# Altium PCB LMX2592.PcbDoc
Units mil, origin at the board's own origin, x right, y up, seen from the top; angles counter-clockwise.
Board outline 1035 x 1455 mil, 4 copper layers (L1, L2, L3, L4), stack 59.528 mil thick; 43 components, 29 nets, 153 pads, 100 vias.
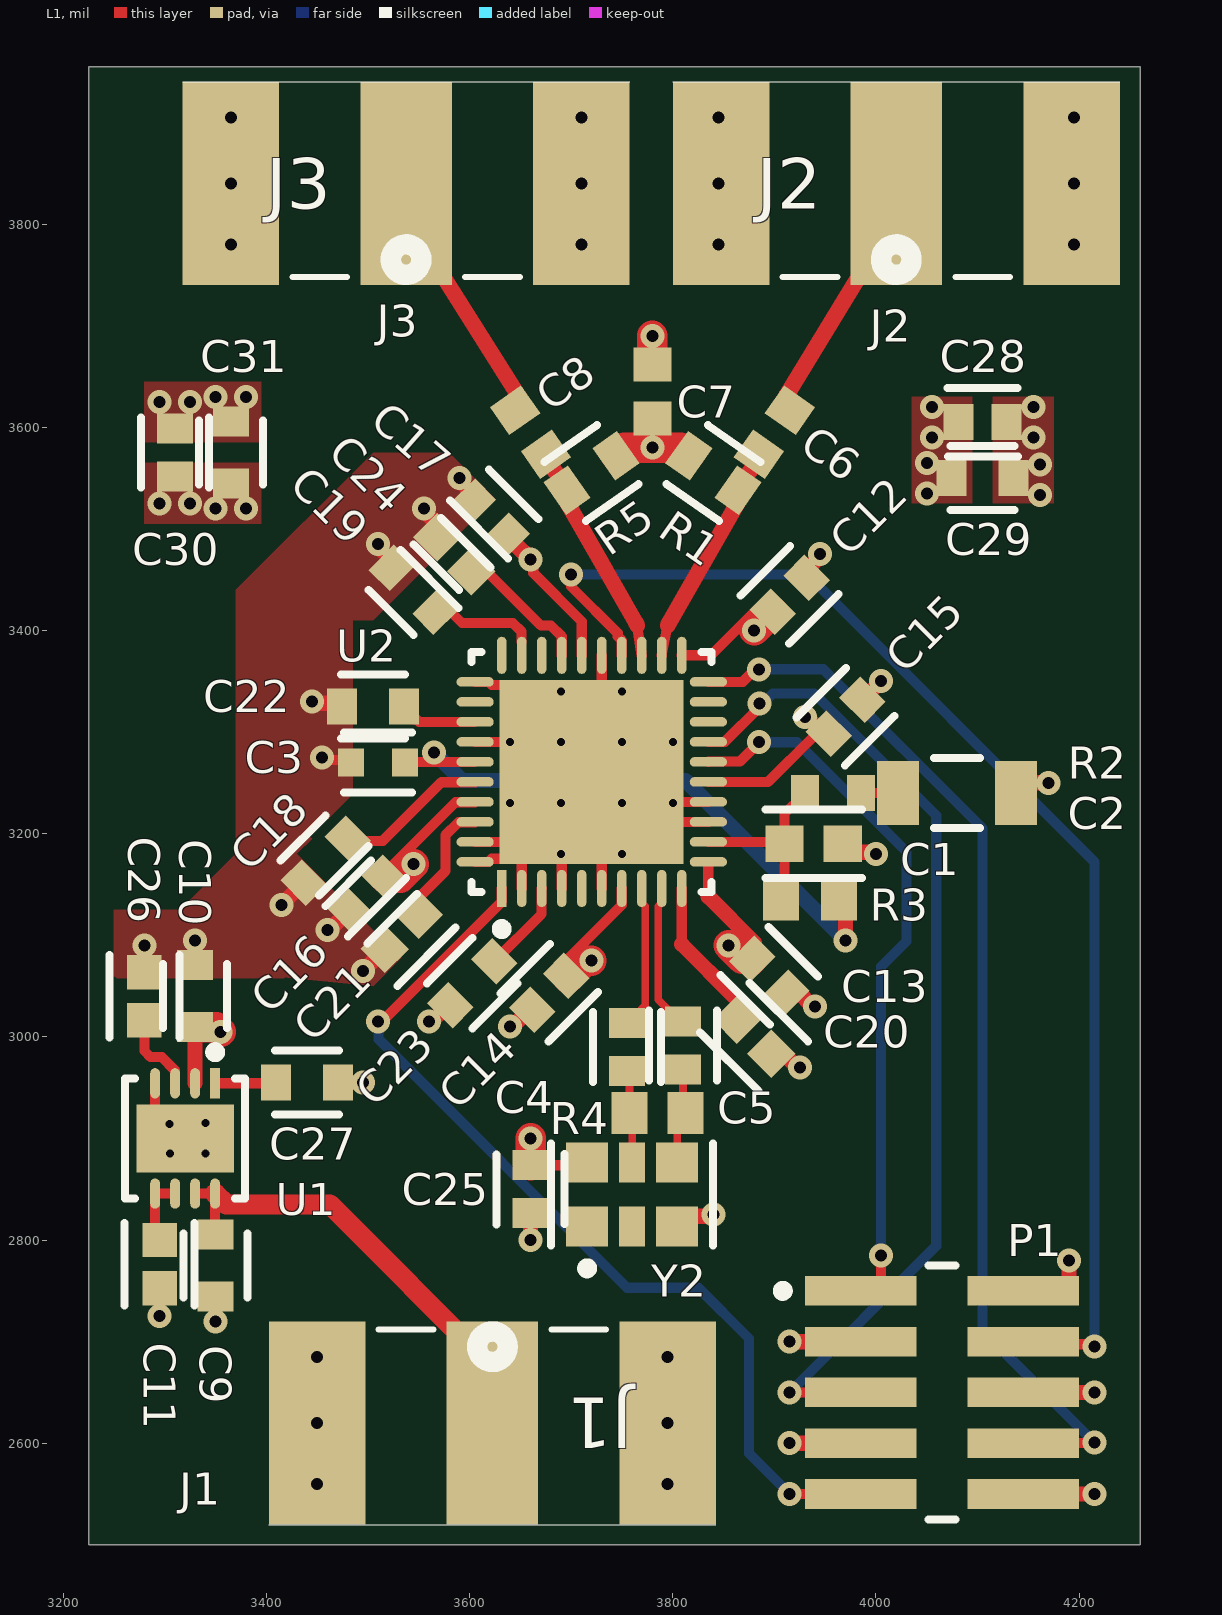
[diagram p0: L1 view]
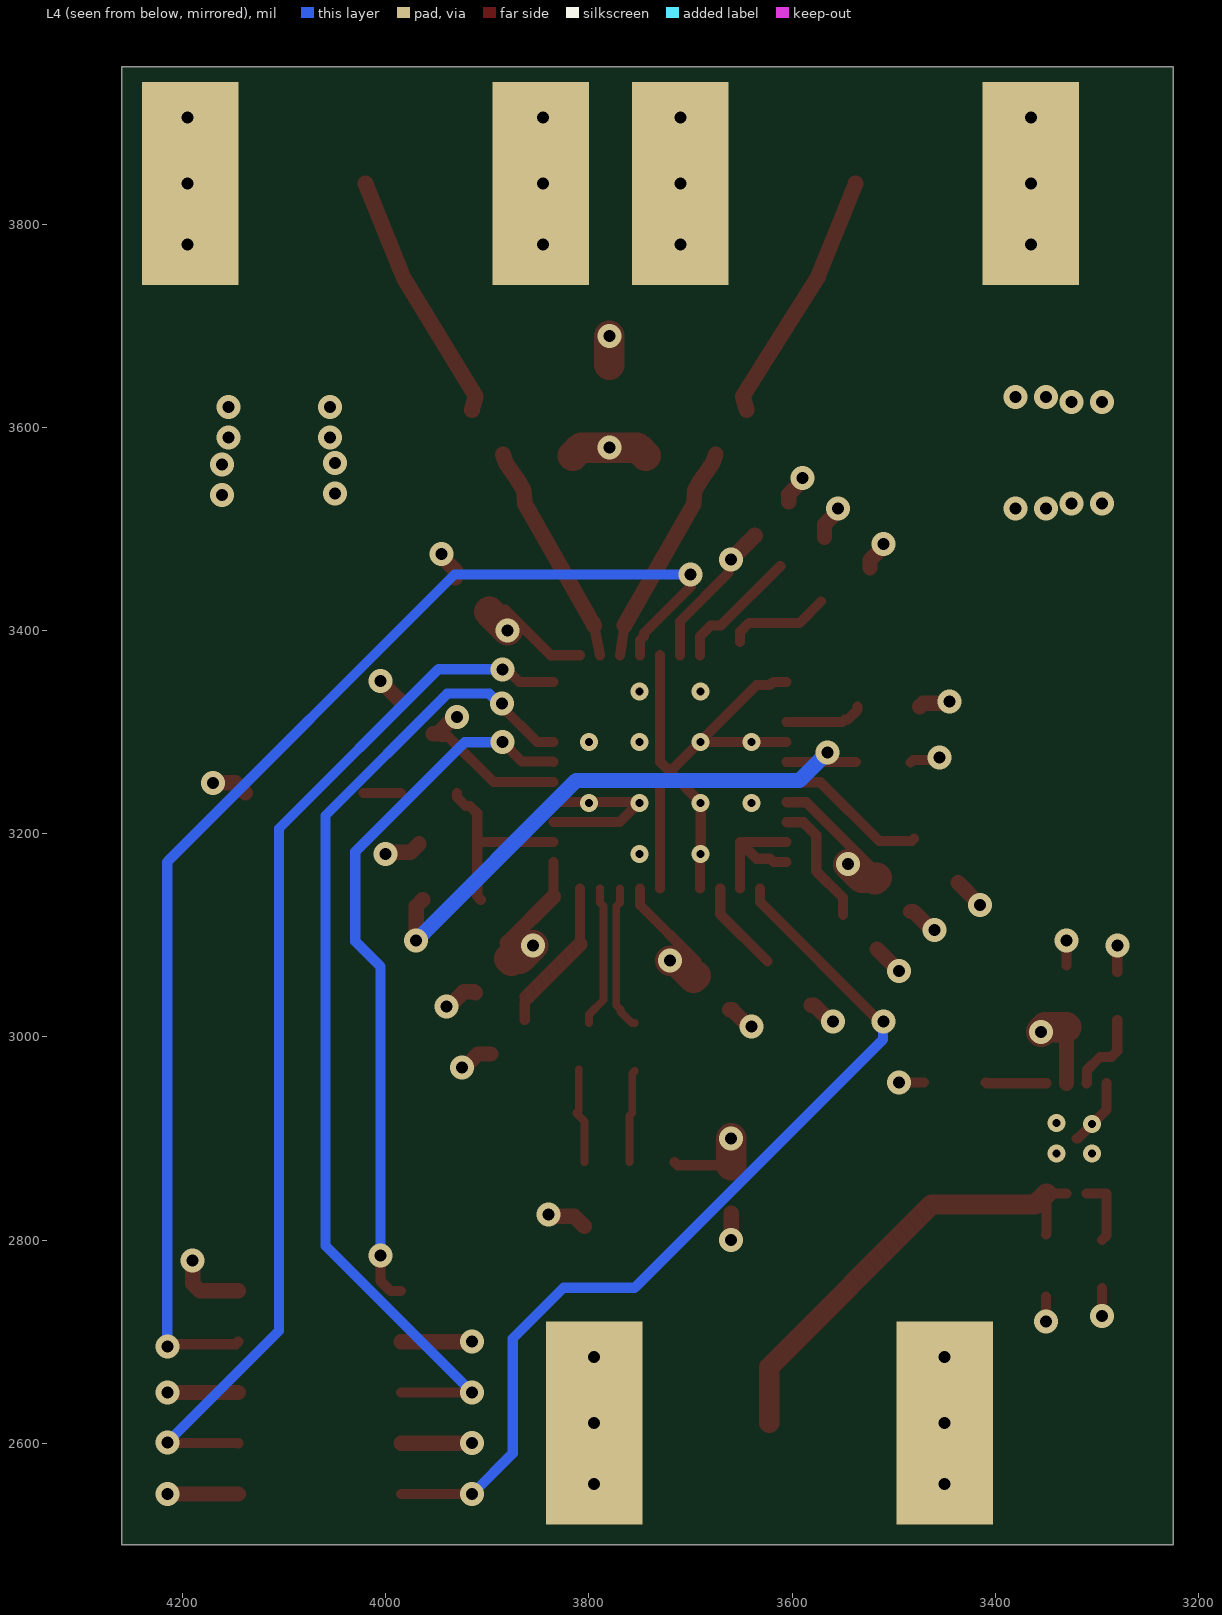
[diagram p1: L4 view, seen from below]
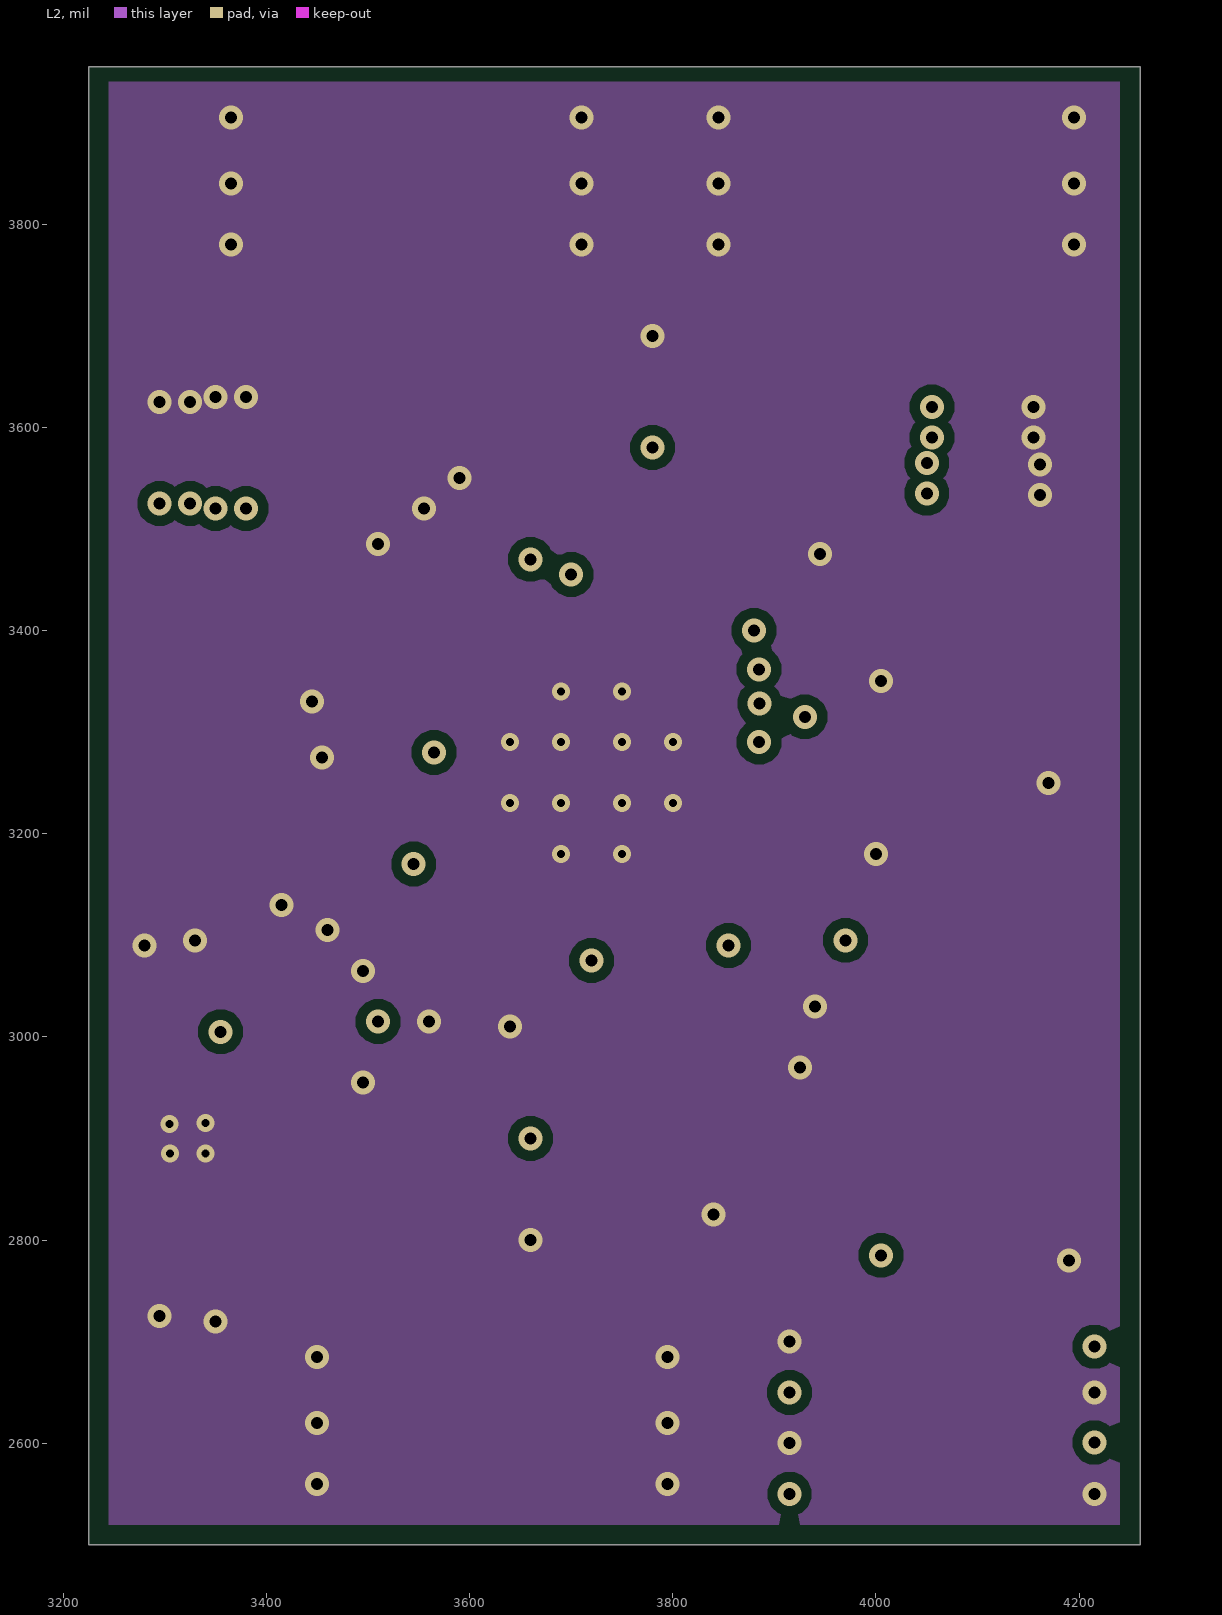
[diagram p2: L2]
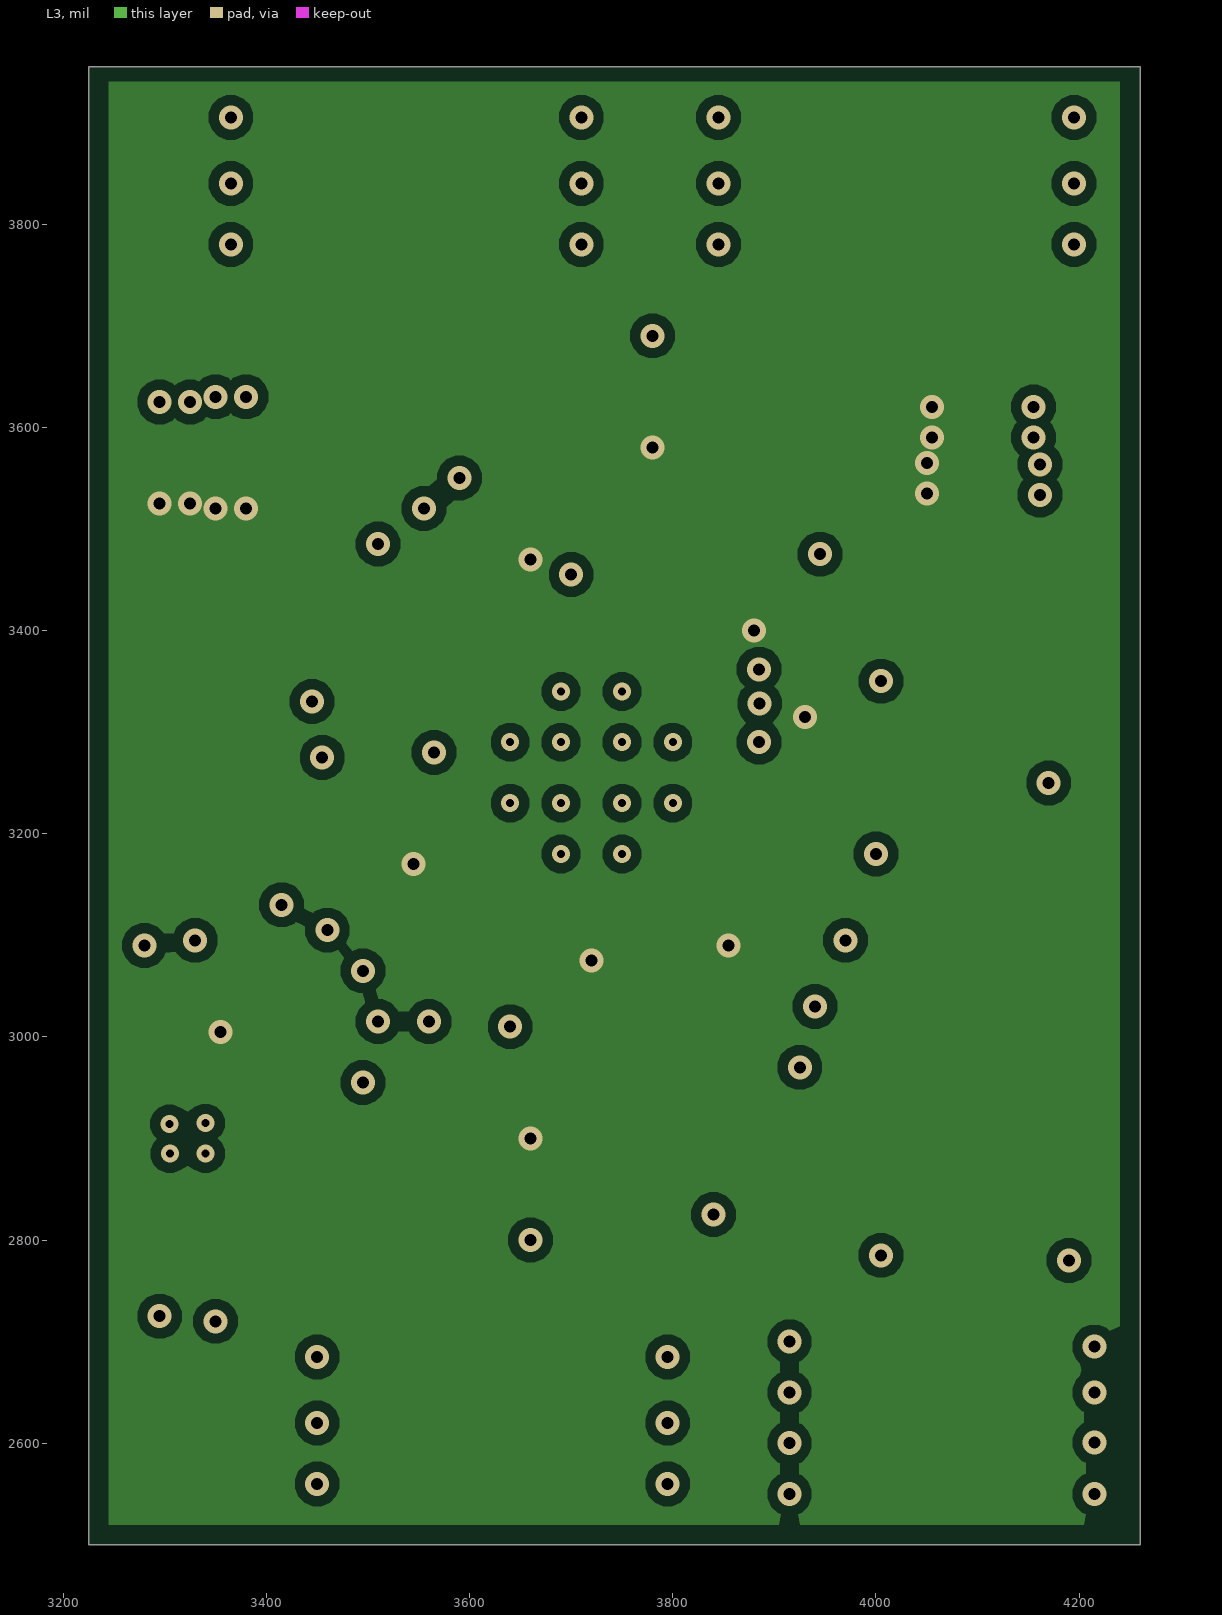
[diagram p3: L3]
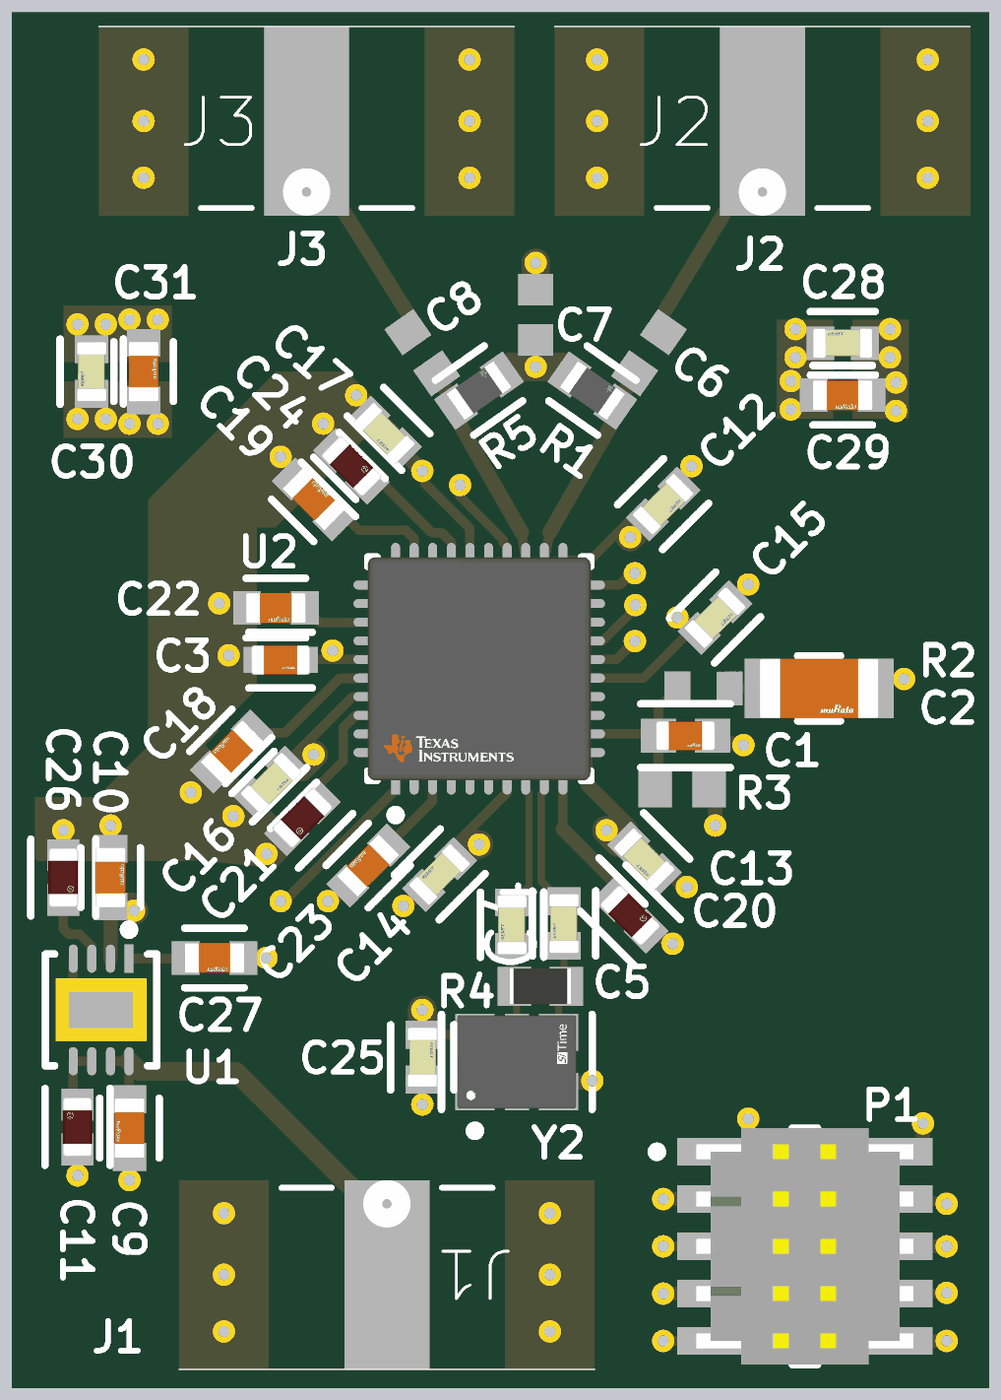
[diagram p4: 3D render of the assembled board from above, using the file's embedded part models]

## Layer stack, top to bottom
Top Solder: solder mask 0.591, Solder Resist, Dk 3.5
L1: signal copper 1.693
Dielectric 1: prepreg 7.874, FR408HR 2113, Dk 3.61
L2: signal copper 0.689
Dielectric 2: core 39.016, FR408HR, Dk 4.8
L3: signal copper 0.689
Dielectric 3: prepreg 7.874, FR408HR 2113, Dk 3.61
L4: signal copper 1.693
Bottom Solder: solder mask 0.591, Solder Resist, Dk 3.5

## Board outline
3225,2500 3225,3955 4260,3955 4260,2500

## Design rules (kind name [scope] priority, off if disabled: settings)
Clearance OSC_PAD [IsPad And InComponent('U1')] p1: gap=10 ignorepadtopadclearanceinfootprint=FALSE except(3: SMDPad-SMDPad; 6: Arc-Arc Arc-Track Arc-SMDPad Arc-Via Track-Track Track-SMDPad Track-Via SMDPad-Via)
Clearance OSC_PAIR [InNet('REF_CLK_P') vs InNet('REF_CLK_N')] p2: gap=10 ignorepadtopadclearanceinfootprint=FALSE except(5: Arc-Arc Arc-Track Track-Track; 6: Arc-SMDPad Arc-Via Track-SMDPad Track-Via SMDPad-SMDPad SMDPad-Via)
Clearance PLL_PAD [IsPad And InComponent('U2')] p3: gap=10 ignorepadtopadclearanceinfootprint=FALSE except(3.94: SMDPad-SMDPad; 6: Arc-Arc Arc-Track Arc-SMDPad Arc-Via Track-Track Track-SMDPad Track-Via SMDPad-Via)
Clearance [All] p4: gap=10 ignorepadtopadclearanceinfootprint=FALSE except(6: Arc-Arc Arc-Track Arc-SMDPad Arc-Via Track-Track Track-SMDPad Track-Via SMDPad-SMDPad SMDPad-Via)
DiffPairsRouting RFout_Pair [InDifferentialPair('RFoutA') Or InDifferentialPair('RFoutA_IC')] p1: maxlimit=1000 minlimit=5 mostfreqgap=10 toplayer_minwidth=10 toplayer_maxwidth=16 toplayer_prefwidth=15.58 midlayer1_mingap=10 midlayer1_maxgap=10 midlayer1_minwidth=15 midlayer1_maxwidth=16 midlayer1_prefwidth=15.58 midlayer2_mingap=10 midlayer2_maxgap=10 midlayer2_minwidth=15 midlayer2_maxwidth=16 midlayer2_prefwidth=15.58 bottomlayer_mingap=10 bottomlayer_maxgap=10 bottomlayer_minwidth=15 bottomlayer_maxwidth=16 bottomlayer_prefwidth=15.58 maxuncoupledlength=500
DiffPairsRouting OSC_INPUT_100R [InDifferentialPairClass('OSC_INPUT')] p2: maxlimit=10 minlimit=5 mostfreqgap=10 toplayer_maxgap=5 toplayer_prefgap=5 toplayer_minwidth=7.6 toplayer_maxwidth=7.6 toplayer_prefwidth=7.6 bottomlayer_maxgap=5 bottomlayer_prefgap=5 bottomlayer_minwidth=7.6 bottomlayer_maxwidth=7.6 bottomlayer_prefwidth=7.6 impedanceprofiledriven=TRUE impedanceprofileid={E91DDB21-DC2A-4382-8C97-3C519AFEA08B} impedanceprofilevalue=100.000000 maxuncoupledlength=500
DiffPairsRouting [All] p3: maxlimit=10 minlimit=5 mostfreqgap=10 toplayer_maxgap=5 toplayer_prefgap=5 toplayer_minwidth=7.6 toplayer_maxwidth=7.6 toplayer_prefwidth=7.6 midlayer1_minwidth=15 midlayer1_maxwidth=15 midlayer1_prefwidth=15 midlayer2_minwidth=15 midlayer2_maxwidth=15 midlayer2_prefwidth=15 bottomlayer_maxgap=5 bottomlayer_prefgap=5 bottomlayer_minwidth=7.6 bottomlayer_maxwidth=7.6 bottomlayer_prefwidth=7.6 maxuncoupledlength=500
MatchedLengths RFoutA_IC [InDifferentialPair('RFoutA_IC')] p1: tolerance=2 checknetsindiffpair=FALSE checkdiffpairvsdiffpair=TRUE checkxsignals=TRUE checkothers=TRUE
MatchedLengths RFoutA [InDifferentialPair('RFoutA')] p2: tolerance=2 checknetsindiffpair=FALSE checkdiffpairvsdiffpair=TRUE checkxsignals=TRUE checkothers=TRUE
PolygonConnect SOLID_VIA [IsVia And (InNet('GND') Or InNet('VCC'))] p1: thpad.connectstyle=Relief thpad.reliefconductorwidth=10 thpad.reliefentries=4 thpad.polygonreliefangle="90 Angle" thpad.airgapwidth=10 smdpad.connectstyle=Direct smdpad.reliefconductorwidth=10 smdpad.reliefentries=4 smdpad.polygonreliefangle="90 Angle" smdpad.airgapwidth=10 via.connectstyle=Direct via.reliefconductorwidth=10 via.reliefentries=4 via.polygonreliefangle="90 Angle" via.airgapwidth=10
PolygonConnect [All] p2: connectstyle=Direct reliefconductorwidth=10 reliefentries=4 polygonreliefangle="90 Angle" airgapwidth=10
RoutingVias [All] p1: holewidth=11.8 width=23.6 viastyle="Through Hole" minholewidth=5 minwidth=15 maxholewidth=25 maxwidth=25
SolderMaskExpansion [All] p1: expansion=0 istentingtop=FALSE
SupplyNets "Schematic Supply Nets_2" [InNet('filter')] p1: voltage=0.000
SupplyNets "Schematic Supply Nets_1" [InNet('VCC')] p2: voltage=0.000
SupplyNets "Schematic Supply Nets" [InNet('GND')] p3: voltage=0.000
Width RFout [InNetClass('RFout')] p1: maxlimit=15.58 minlimit=10 preferedwidth=15.58 toplayer_minwidth=15.58 bottomlayer_minwidth=15.58 impedanceprofiledriven=TRUE impedanceprofileid={2815D8CE-D5EF-48F0-AF0F-1926F518CACF} impedanceprofilevalue=50.000000 minimp=50.000000 maximp=50.000000 favimp=50.000000
Width Filter [InNet('filter')] p2: maxlimit=20 minlimit=10 preferedwidth=15 midlayer1_maxwidth=10 midlayer1_prefwidth=10 midlayer2_maxwidth=10 midlayer2_prefwidth=10 minimp=50.000000 maximp=50.000000 favimp=50.000000
Width Power [OnLayer('L3')] p3: maxlimit=78.74 minlimit=10 preferedwidth=19.68 toplayer_maxwidth=10 toplayer_prefwidth=10 midlayer1_maxwidth=10 midlayer1_prefwidth=10 bottomlayer_maxwidth=10 bottomlayer_prefwidth=10 minimp=50.000000 maximp=50.000000 favimp=50.000000
Width [All] p4: maxlimit=50 minlimit=10 preferedwidth=15 toplayer_prefwidth=10 midlayer1_maxwidth=10 midlayer1_prefwidth=10 bottomlayer_maxwidth=10 bottomlayer_prefwidth=10 minimp=50.000000 maximp=50.000000 favimp=50.000000
29 further rules are at their usual default settings.

## Classes and differential pairs
net class RFout: RFoutA_IC_N RFoutA_IC_P RFoutA_N RFoutA_P
differential pair RFoutA_IC: +RFoutA_IC_P -RFoutA_IC_N
differential pair RFoutA: +RFoutA_P -RFoutA_N
differential pair REF_SRC: +REF_SRC_P -REF_SRC_N
differential pair REF_CLK: +REF_CLK_P -REF_CLK_N

## Components (designator, comment, footprint, x,y, rotation, side; value= is the part's Value field where it differs from the comment)
C1 "1.5nF" FP-GRM188-0_1-e0_2_0_5-IPC_B 3938.61,3190 r0 top
C2 "68nF" FP-GRM319-0_15-MFG 4080,3240 r0 top
C3 "3.3nF" FP-GCM188-0_1-MFG 3510,3270 r0 top
C4 "0.1uF" FP-C0603C-CF-MFG 3755,2990 r90 top value="0.10 μF"
C5 "0.1uF" FP-C0603C-CF-MFG 3810,2991.38 r90 top value="0.10 μF"
C6 "100pF" CAPC1608X90X35NL10T15 3900,3595 r55 top
C7 "100pF" CAPC1608X90X35NL10T15 3780,3635 r90 top
C8 "100pF" CAPC1608X90X35NL10T15 3660,3595 r125 top
C9 "10uF" FP-GRM188-0_15-MFG 3350,2775 r270 top
C10 "10uF" FP-GRM188-0_15-MFG 3330,3040 r90 top
C11 "1uF" FP-0603-L_1_6_0_15-W_0_8-IPC_C 3295,2776.29 r90 top
C12 "0.1uF" FP-C0603C-CF-MFG 3915,3435 r225 top value="0.10 μF"
C13 "0.1uF" FP-C0603C-CF-MFG 3895,3060 r135 top value="0.10 μF"
C14 "0.1uF" FP-C0603C-CF-MFG 3678.3,3043.3 r45 top value="0.10 μF"
C15 "0.1uF" FP-C0603C-CF-MFG 3970,3315 r225 top value="0.10 μF"
C16 "0.1uF" FP-C0603C-CF-MFG 3500,3140 r225 top value="0.10 μF"
C17 "0.1uF" FP-C0603C-CF-MFG 3620,3510 r135 top value="0.10 μF"
C18 "10uF" FP-GRM188-0_15-MFG 3458.42,3173.42 r225 top
C19 "10uF" FP-GRM188-0_15-MFG 3545,3440 r135 top
C20 "1uF" FP-0603-L_1_6_0_15-W_0_8-IPC_C 3880,3000 r315 top
C21 "1uF" FP-0603-L_1_6_0_15-W_0_8-IPC_C 3533.24,3103.24 r225 top
C22 "10uF" FP-GRM188-0_15-MFG 3505,3325 r0 top
C23 "10uF" FP-GRM188-0_15-MFG 3602.73,3052.73 r225 top
C24 "1uF" FP-0603-L_1_6_0_15-W_0_8-IPC_C 3585,3475 r315 top
C25 "0.1uF" FP-C0603C-CF-MFG 3660,2850 r270 top value="0.10 μF"
C26 "1uF" FP-0603-L_1_6_0_15-W_0_8-IPC_C 3280,3040 r270 top
C27 "10uF" FP-GRM188-0_15-MFG 3440,2955 r0 top
C28 "0.1uF" FP-C0603C-CF-MFG 4105,3605 r0 top value="0.10 μF"
C29 "10uF" FP-GRM188-0_15-MFG 4105,3550 r0 top
C30 "0.1uF" FP-C0603C-CF-MFG 3310,3575 r90 top value="0.10 μF"
C31 "10uF" FP-GRM188-0_15-MFG 3365,3575 r90 top
J1 "142-0701-851" CONN_142-0701-851_CIN 3622.5,2613.5 r180 top
J2 "142-0701-851" CONN_142-0701-851_CIN 4020,3846.5 r0 top
J3 "142-0701-851" CONN_142-0701-851_CIN 3537.5,3846.5 r0 top
P1 "FTSH-105-01-L-DV-K" SMTC-FTSH-105-01-L-DV-K_V 4065,2650 r270 top
R1 "50R" FP-CRCW0603-e3-MFG 3840,3555 r325 top
R2 "120R" RESC1608X55X25NL10T15 3957.56,3240 r0 top
R3 "68R" RESC1608X55X30ML15T15 3935,3135 r0 top
R4 "100R" RESC1609X50X30ML8T20 3785,2925 r0 top
R5 "50R" FP-CRCW0603-e3-MFG 3720,3555 r35 top
U1 "ADM7150ACPZ-3.3-R7" FP-CP-8-11-IPC_C 3320,2900 r270 top
U2 "LMX2592RHAT" FP-RHA0040H-IPC_B 3720.25,3260.79 r90 top
Y2 "200MHz" FP-SiT5021AI-MFG 3760,2845 r90 top

## Footprints (in the part's own frame and the unit in brackets; to place one, negate y for a bottom-side part, rotate by r counter-clockwise, add the part's x,y. Pads: shape width x height; smd on the part's side, far side on the other; paste and mask are expansions set on the pad)
CAPC1608X90X35NL10T15 [mm] "Chip Capacitor, 2-Leads, Body 1.60x0.80mm, IPC Medium Density"
  rect 0.85x0.95 smd: 1(-0.675,0) 2(0.675,0)
  body extent -0.85,-0.45 0.85,0.45, height 0.9
CONN_142-0701-851_CIN [mil]
  rect 90x200 smd paste+0 mask+0: 1(0,-6.5)
  rect 95x200 smd paste-100 mask-100: 2(-172.5,-6.5) 3(172.5,-6.5)
  rect 95x200 smd far side paste-100 mask-100: 4(-172.5,-6.5) 5(172.5,-6.5)
  silkscreen extent -220,-99 220,94
FP-0603-L_1_6_0_15-W_0_8-IPC_C [mil]
  rect 33.77x33.94 smd paste+0 mask+0: 1(-23.71,0) 2(23.71,0)
  silkscreen extent -41,-34 41,34, body extent -45,-23 45,23, height 10
FP-C0603C-CF-MFG [mm]
  rect 0.75x0.9 smd paste+0 mask+0: 1(-0.6,0) 2(0.6,0)
  silkscreen extent -0.87,-0.85 0.88,0.85, body extent -1.2,-0.6 1.2,0.6, height 0.25
FP-CP-8-11-IPC_C [mm]
  rect 0.756x0.242 smd paste+0 mask+0: 1(-1.378,0.75)
  rrect100% 0.756x0.242 smd paste+0 mask+0: 2(-1.378,0.25) 3(-1.378,-0.25) 4(-1.378,-0.75) 5(1.378,-0.75) 6(1.378,-0.25) 7(1.378,0.25) 8(1.378,0.75)
  rect 1.7x2.44 smd paste-1000 mask+0: 9(0,0)
  silkscreen extent -2.28,-1.5 1.5,1.5
FP-CRCW0603-e3-MFG [mm]
  rect 0.75x1 smd paste+0 mask+0: 1(-0.75,0) 2(0.75,0)
  silkscreen extent -0.8,-0.9 0.8,0.9, body extent -1.22,-0.6 1.22,0.6, height 0.25
FP-GCM188-0_1-MFG [mm]
  rect 0.65x0.7 smd paste+0 mask+0: 1(-0.675,0) 2(0.675,0)
  silkscreen extent -0.85,-0.75 0.85,0.75, body extent -1.1,-0.55 1.1,0.55, height 0.25
FP-GRM188-0_1-e0_2_0_5-IPC_B [mil]
  rect 37.74x35.91 smd paste+0 mask+0: 1(-28.61,0) 2(28.61,0)
  silkscreen extent -47,-34 47,34, body extent -57,-28 57,28, height 10
FP-GRM188-0_15-MFG [mm]
  rect 0.75x0.9 smd paste+0 mask+0: 1(-0.775,0) 2(0.775,0)
  silkscreen extent -0.8,-0.8 0.8,0.8, body extent -1.25,-0.58 1.25,0.58, height 0.25
FP-GRM319-0_15-MFG [mm]
  rect 1.05x1.6 smd paste+0 mask+0: 1(-1.475,0) 2(1.475,0)
  silkscreen extent -0.58,-0.87 0.58,0.87, body extent -2.1,-0.98 2.1,0.98, height 0.25
FP-RHA0040H-IPC_B [mm]
  rect 0.929x0.239 smd paste+0 mask+0: 1(-2.915,2.25)
  rrect100% 0.929x0.239 smd paste+0 mask+0: 2(-2.915,1.75) 3(-2.915,1.25) 4(-2.915,0.75) 5(-2.915,0.25) 6(-2.915,-0.25) 7(-2.915,-0.75) 8(-2.915,-1.25) 9(-2.915,-1.75) 10(-2.915,-2.25) 21(2.915,-2.25) 22(2.915,-1.75) 23(2.915,-1.25) 24(2.915,-0.75) 25(2.915,-0.25) 26(2.915,0.25) 27(2.915,0.75) 28(2.915,1.25) 29(2.915,1.75) 30(2.915,2.25)
  rrect100% 0.239x0.929 smd paste+0 mask+0: 11(-2.25,-2.915) 12(-1.75,-2.915) 13(-1.25,-2.915) 14(-0.75,-2.915) 15(-0.25,-2.915) 16(0.25,-2.915) 17(0.75,-2.915) 18(1.25,-2.915) 19(1.75,-2.915) 20(2.25,-2.915) 31(2.25,2.915) 32(1.75,2.915) 33(1.25,2.915) 34(0.75,2.915) 35(0.25,2.915) 36(-0.25,2.915) 37(-0.75,2.915) 38(-1.25,2.915) 39(-1.75,2.915) 40(-2.25,2.915)
  rect 4.6x4.6 smd paste-1000 mask+0: 41(0,0)
  silkscreen extent -4.05,-3 3,3, body extent -3.63,-3.63 3.63,3.63, height 0.25
FP-SiT5021AI-MFG [mm]
  rect 1x1.05 smd paste+0 mask+0: 1(-0.8,1.125) 3(-0.8,-1.125) 4(0.8,-1.125) 6(0.8,1.125)
  rect 1x0.65 smd paste+0 mask+0: 2(-0.8,0) 5(0.8,0)
  silkscreen extent -1.97,-2.02 1.28,2.02, body extent -1.4,-1.75 1.4,1.75, height 0.25
RESC1608X55X25NL10T15 [mm] "Chip Resistor, 2-Leads, Body 1.70x0.90mm, IPC Medium Density"
  rect 0.7x0.9 smd: 1(-0.7,0) 2(0.7,0)
  body extent -0.85,-0.45 0.85,0.45, height 0.55
RESC1608X55X30ML15T15 [mm] "Chip Resistor, 2-Leads, Body 1.60x0.80mm, IPC Low Density"
  rect 0.9x1.05 smd: 1(-0.725,0) 2(0.725,0)
  body extent -0.87,-0.48 0.87,0.48, height 0.55
RESC1609X50X30ML8T20 [mm] "Chip Resistor, 2-Leads, Body 1.65x0.95mm, IPC Low Density"
  rect 0.9x1.05 smd: 1(-0.7,0) 2(0.7,0)
  body extent -0.82,-0.48 0.82,0.48, height 0.5
SMTC-FTSH-105-01-L-DV-K_V [mm] "CONN, 10-Leads, Body 6.35x3.43mm, Pitch 1.27mm"
  rect 0.74x2.79 smd: 1(-2.54,-2.035) 2(-2.54,2.035) 3(-1.27,-2.035) 4(-1.27,2.035) 5(0,-2.035) 6(0,2.035) 7(1.27,-2.035) 8(1.27,2.035) 9(2.54,-2.035) 10(2.54,2.035)
  silkscreen extent -3.17,-4.1 3.17,0.34, body extent -3.17,-2.92 3.18,2.92, height 6.12

## Part data
C1: library part CMP-06035-043535-1, "Chip Multilayer Ceramic Capacitors for General Purpose, 0603, 1500pF, C0G, 30ppm/°C, 5%, 50V", Case Code (Imperial)=0603, Case Code (Metric)=1608, Dielectric=C0G, Dielectric Material=Ceramic, Insulation Resistance=10GR, Max Operating Temperature=125°C, Min Operating Temperature=-55°C, Package Quantity=1, Temperature Coefficient=30ppm/°C, Tolerance=5%, Voltage=50V, Capacitance=1.5nF, Case/Package=0603, Depth=0.8mm, Height=0.8mm, Lead Free="Lead Free", Length=1.6mm, Material=Ceramic, Mount="Surface Mount", Number of Pins=2, Packaging="Tape and Reel", Radiation Hardening=No, REACH SVHC="No SVHC", Termination=SMD/SMT, Thickness=0.035inch, Voltage Rating=50V, Voltage Rating (DC)=50V, Width=0.8mm
C2: library part CMP-06035-047801-1, "Chip Multilayer Ceramic Capacitors for General Purpose, 1206, 68000pF, C0G, 30ppm/°C, 5%, 50V"
C3: library part CMP-06035-044585-1, "Ceramic Capacitor for Automotive 3.3nF  ±1% 50VDC C0G 0603 Paper T/R"
C4 C5 C12 C13 C14 C15 C16 C17 C25 C28 C30: library part CMP-2006-03061-2, "CAP CER 0.1UF 50V X7R 0603", Capacitance="0.10 μF", Manufacturer=KEMET, Manufacturer Part Number=C0603C104K5RACTU, Package=C0603C-CF, Temperature="-55°C to +125°C", Temperature Characteristic=X7R, Temperature Coefficient=30ppm/°C, Temperature Range High=+125°C, Temperature Range Low=-55°C, Tolerance=0.1, Voltage Rating="50 V", Automotive=Yes, Automotive Grade="Grade 1", Category=Cap, ComponentLink2Description=Datasheet, ComponentLink2URL=https://api.kemet.com/component-edge/download/datasheet/C0603C100J5GACAUTO.pdf, Device Class L1="Passive Components", Device Class L2=Capacitors, Device Class L3="Ceramic Capacitors", Digikey Description="CAP CER 0.1UF 50V X7R 0603", Height=0.87mm, Lead Free=Yes, Material=Ceramic, Octopart=https://octopart.com/c0603c104k5ractu-kemet-139244, RoHS=TRUE
C6 C7 C8: library part CMP-2006-02595-1, Manufacturer=Murata, Part Number=GRM1885C1H101JA01D
C9 C10 C18 C19 C22 C23 C27 C29 C31: library part CMP-06035-003612-1, "Chip Multilayer Ceramic Capacitors for General Purpose, 0603, 10uF, X5R, 15%, 20%, 10V", Case Code (Imperial)=0603, Case Code (Metric)=1608, Dielectric=X5R, Max Operating Temperature=85°C, Min Operating Temperature=-55°C, Package Quantity=4000, Tolerance=20%, Voltage Rating=10V, Capacitance=10uF, Case/Package=0603, Depth=0.8mm, Height=0.8mm, Lead Free="Lead Free", Length=1.6mm, Material=Ceramic, Mount="Surface Mount", Packaging="Tape and Reel", Termination=SMD/SMT, Thickness=0.035inch, Voltage Rating (DC)=10V, Weight=0.000222oz, Width=0.8mm
C11 C20 C21 C24 C26: library part CMP-2000-07531-4, "Ceramic Capacitor General Use 1uF ±10% 50V X7R 0603", Case Code (Imperial)=0603, Case Code (Metric)=1608, Dielectric=X7R, Max Operating Temperature=125°C, Min Operating Temperature=-55°C, Package Quantity=1, Tolerance=10%, Voltage Rating=50V, Capacitance=1uF, Case/Package=0603, Construction=Flat, Depth=0.8mm, Halogen Free="Halogen Free", Height=0.8mm, Length=1.6mm, Mount="Surface Mount", Packaging="Tape and Reel", Radiation Hardening=No, RoHS Compliant=Yes, Series=M, Termination=SMD/SMT, Thickness=0.037inch, Voltage Rating (DC)=50V, Width=0.031inch
J1 J2 J3: "Description", Manufacturer_Name="Cinch Connectivity Solutions", Copyright="Copyright (C) 2026 Ultra Librarian. All rights reserved.", Manufacturer_Part_Number=142-0701-851, RefDes=RefDes, Type=Type
P1: library part CMP-2000-05353-1, "Male Header, Pitch 1.27 mm, 2 x 5 Position, Height 6.25 mm", Color=Black, Manufacturer=Samtec, Package Description="Male Header, Pitch 1.27 mm, 2 x 5 Position, Height 5.97 mm, Tail Length 4.32 mm", Standard Package=1, Category=Connectors,Interconnects, Connector Type=Header,Unshrouded, Contact Finish=Gold, Contact Finish Thickness=10µin(0.25µm), Contact Mating Length="0.120\"(3.05mm)", Contact Type=MalePin, Datasheet URL=http://suddendocs.samtec.com/prints/ftsh-1xx-xx-xxx-dv-xxx-mkt.pdf, Datasheet Version="Rev. ET, 10/1995", Family=RectangularConnectors-Headers,MalePins, Manufacturer URL=http://www.samtec.com/, Mating Products="SFMC-105-L2-S-D-TR-ND / -CONN.05\"SURFACE10POSSMT / FLE-105-01-G-DV-TR-ND / -CONNSKT1.27MM10POSDUALSMD / FLE-105-01-G-DV-A-P-ND / -CONNSKT1.27MM10POSDUALSMD / FLE-105-01-G-DV-A-ND / -CONNSKT1.27MM10POSDUALSMD / CLP-105-02-G-D-P-TR-ND / -CONNRCPT10POSDUAL.05\"SMD / SAM1155-05-ND / -CONNRCPT10POSDUAL.05\"SMD / SAM1154-05-ND / -CONNRCPT10POSDUAL.05\"SMD / SAM1153-05-ND / -CONNRCPT10POSDUAL.05\"SMD / SAM1226-05-ND / -CONNRCPT.05\"10POSDUALSMD", Mounting Type=SurfaceMount, Number of Positions=10, Number of Positions Loaded=All, Number of Rows=2, Other Names=Q3937619, Package Reference=FTSH-105-01-L-DV-K, Package URL=http://suddendocs.samtec.com/prints/ftsh-1xx-xx-xxx-dv-xxx-footprint.pdf, Packaging=Tube, Pitch="0.050\"(1.27mm)", Product Training Modules=Board-to-BoardConnectors, Row Spacing="0.050\"(1.27mm)", Series=FTSH, Termination=Solder
R1 R5: library part CMP-2000-03436-2, "RES Thick Film, 50Ω, 1%, 0.1W, 100ppm/°C, 0603", Case Code (Imperial)=0603, Case Code (Metric)=1608, Max Operating Temperature=155°C, Min Operating Temperature=-55°C, Package Quantity=5000, Power Rating=100mW, Temperature Coefficient=100ppm/°C, Tolerance=1%, Voltage Rating=75V, Case/Package=0603, Composition="Thick Film", Contact Plating=Tin, Depth=0.85mm, Height=0.45mm, Lead Free="Lead Free", Length=1.55mm, Military Standard=Not, Mount="Surface Mount", Number of Pins=2, Packaging="Tape and Reel", Radiation Hardening=No, REACH SVHC="No SVHC", Resistance=50R, Termination=SMD/SMT, Voltage Rating (DC)=75V, Weight=7.1E-05oz, Width=0.85mm
R2: library part CMP-1659-00034-1, "Chip Resistor, 120 Ohm, +/- 1%, 100 mW, -55 to 155 degC, 0603 (1608 Metric), RoHS, Tape and Reel", Case Code (Imperial)=0603, Case Code (Metric)=1608, Colour=Orange, Forward Current="20 mA", Forward Voltage="2.1 V", Max Operating Temperature="100 degC", Min Operating Temperature="-40 degC", Package Quantity=3000, Power Rating="90 mW", Case\Package=0603, ComponentLink1Description="Manufacturer URL", ComponentLink1URL=http://www.yageo.com/, ComponentLink2Description=Datasheet, ComponentLink2URL=http://www.yageo.com/documents/recent/PYu-RC_Group_51_RoHS_L_04.pdf, DatasheetVersion="Rev. 4, 02/2016", Height="0.6 mm", Illumination Colour=Orange, Length="1.6 mm", Lens Style=Diffused, Luminous Intensity="80 mcd", Mount="Surface Mount", Nominal Vf="2.1 V", Nominal Wavelength="606 nm", PackageDescription="2-Pin Surface Mount Device, Body 1.6 x 0.8 mm", PackageReference=0603, Packaging="Tape and Reel", Pins=2, Radiation Hardening=No, REACH SVHC=Unknown, RoHSCompliant=true, Viewing Angle="160 degrees", Width="0.8 mm"
R3: library part CMP-2000-00818-1, Manufacturer=Panasonic, Part Number=ERJ-3GEYJ680V
R4: library part CMP-2000-03824-5, "Chip Resistor, 100 Ohm, +/- 1%, 100 mW,-55 to 155 degC, 0603 (1608 Metric), RoHS, Tape and Ree", Manufacturer="Vishay Semiconductor", ComponentLink1Description="Manufacturer URL", ComponentLink1URL=http://www.vishay.com/, ComponentLink2Description=Datasheet, ComponentLink2URL=http://www.vishay.com/docs/20035/dcrcwe3.pdf, DatasheetVersion=06/2012, Mounting Technology="Surface Mount", PackageDescription="2-Pin Surface Mount Device, Body 1.575 x 0.85 mm", PackageReference=0603
U1: library part CMP-09138-000026-1, "IC REG LINEAR 3.3V 800MA 8LFCSP", Max Input Voltage=16V, Max Operating Temperature=125°C, Max Output Current=800mA, Min Current Limit=1A, Min Input Voltage=4.5V, Min Operating Temperature=-40°C, Operating Supply Current=8.6mA, Output Voltage=3.3V, Power Supply Rejection Ratio (PSRR)=-86dB, Quiescent Current=7mA, Accuracy=1%, Contact Plating=Tin, Lead Free="Contains Lead", Mount="Surface Mount", Number of Outputs=1, Number of Pins=8, Number of Regulators=1, Output Current=800mA, Output Type=Fixed, Packaging="Tape and Reel", Polarity=Positive, RoHS Compliant=Yes
U2: library part CMP-04856-000019-1, "IC PLL FREQ SYNTH W/VCO 40VQFN", Case/Package=VQFN, Frequency=9.8GHz, Max Operating Temperature=85°C, Max Supply Voltage=3.45V, Min Operating Temperature=-40°C, Min Supply Voltage=3.15V, Operating Supply Voltage=3.3V, Input=CMOS, Lead Free="Lead Free", Max Frequency=9.8GHz, Mount="Surface Mount", Number of Circuits=1, Number of Pins=40, Packaging="Cut Tape", PLL=Yes, REACH SVHC="No SVHC", RoHS Compliant=Yes
Y2: library part CMP-25159-261274-1, "MEMS OSC VCTCXO 200.0000MHZ LVDS", Case/Package=SMD/SMT, Frequency Stability=5ppm, Max Operating Temperature=85°C, Max Supply Current=55mA, Min Operating Temperature=-40°C, Frequency=200MHz, Mount="Surface Mount", Packaging="Tape and Reel", RoHS Compliant=Yes

## Via types
v1: diameter 23.62, hole 11.81, L1 to L4, 84 vias
v2: diameter 17.72, hole 7.87, L1 to L4, 16 vias

## Nets (pads, with @x,y where several pads share a name; then routed paths per layer and width w, separated by ;. In a path a pad name is that pad's centre, name@x,y a point inside that pad or via, vN(x,y) a via of type N, cw(c..) or ccw(c..) an arc to the next point about the centre after c; other vN are vias at no path point)
filter: C3.2 R3.2 U2.35 | length 582.6
  L1 w10: C3.2@3537.2,3270.63 U2.35
  L1 w15: R3.2 3970,3128.54 v1@3970,3105
  L4 w15: v1(3565,3280) 3592.64,3252.36 3812.64,3252.36 v1(3970,3095)
GND: C1.2 C2.2 C3.1 C7.2 C9.2 C10.2 C11.1 C12.1 C13.1 C14.1 C15.1 C16.2 C17.2 C18.2 C19.2 C20.2 C21.2 C22.1 C23.2 C24.1 C25.2 C26.1 C27.2 C28.2 C29.2 C30.2 C31.2 J1.2 J1.3 J1.4 J1.5 J2.2 J2.3 J2.4 J2.5 J3.2 J3.3 J3.4 J3.5 P1.2 P1.3 P1.6 P1.7 P1.10 U1.4 U1.9 U2.2 U2.4 U2.6 U2.13 U2.14 U2.25 U2.31 U2.34 U2.39 U2.40 U2.41 Y2.3 | length 2092.2
  L1 w10: C26.1 v1(3280,3090) ; U1.4 3290.47,2928.46 3318.94,2900 U1.9 ; v1(3295,2725) C11.1 ; C10.2 v1(3330,3095) ; v1(3350,2720) C9.2 ; v1(3455,3275) 3457.5,3272.5 3480.93,3272.5 C3.1 ; C27.2 v1(3495,2955) ; U2.40 3618.51,3172.2 3621.63,3175.33 3634.8,3175.33 U2.41@3651.36,3191.89 ; U2.39 U2.41@3651.36,3191.89 ; U2.34 3690.73,3290.32 U2.41 ; U2.31 3618.51,3349.37 3621.63,3346.24 3634.8,3346.24 U2.41 ; U2.2 U2.41@3651.36,3191.89 ; U2.4 3690.73,3179.27 v2(3690,3180) 3690,3230.53 U2.41 ; U2.6 U2.41@3730.1,3250.94 ; U2.25 3730.1,3270.63 U2.41 ; U2.13 3769.47,3211.57 3749.78,3231.26 U2.14
  L1 w15: v1(3415,3130) C18.2 ; v1(3445,3330) 3446.65,3328.35 3471.14,3328.35 C22.1 ; v1(3460,3105) 3462.33,3105 3480.63,3123.3 C16.2 ; v1(3495,3065) C21.2 ; v1(3510,3485) 3510,3482.67 3523.42,3469.24 C19.2 ; v1(3555,3520) 3555,3517.67 3568.24,3504.43 C24.1 ; v1(3560,3015) 3562.33,3015 3578.49,3031.15 C23.2 ; v1(3590,3550) 3590,3547.67 3603.3,3534.37 C17.2 ; v1(3640,3010) 3642.33,3010 3658.93,3026.59 C14.1 ; v1(3660,2800) C25.2 ; Y2.3 3814.14,2823.35 3838.35,2823.35 v1(3840,2825) ; C20.2 3909.43,2983.24 3922.67,2970 v1(3925,2970) ; C13.1 3912.9,3044.49 3923.17,3044.49 3937.67,3030 v1(3940,3030) ; v1(3915,2600) P1.7 ; v1(3915,2700) P1.3 ; C12.1 3931.7,3459.37 3945,3472.67 v1(3945,3475) ; C1.2 3975.57,3181.65 3998.35,3181.65 v1(4000,3180) ; C15.1 v1(4005,3350) ; C2.2 4148.07,3250 v1(4170,3250) ; P1.10 v1(4215,2550) ; P1.6 v1(4215,2650) ; P1.2 4182.93,2750 4190,2757.07 v1(4190,2780)
  L1 w30: C7.2 v1(3780,3690)
  other v1: 3450,2560 3795,2560 3450,2620 3795,2620 3450,2685 3795,2685 4161.39,3533.44 4161.39,3563.44 4155,3590 4155,3620 3295,3625 3325,3625 3350,3630 3380,3630 3365,3780 3710,3780 3845,3780 4195,3780 3365,3840 3710,3840 3845,3840 4195,3840 3365,3905 3710,3905 3845,3905 4195,3905
  other v2: 3305,2885 3340,2885 3304.7,2914.23 3340,2915 3750,3180 3640,3230 3690,3230 3750,3230 3800,3230 3640,3290 3690,3290 3750,3290 3800,3290 3690,3340 3750,3340
NetC1_1: C1.1 R2.1 R3.1 U2.12 | length 192.8
  L1 w10: U2.12 3908.11,3191.89 C1.1 ; R3.1 3910,3138.54 C1.1 ; R2.1 3930,3236.06 3921.22,3227.28 3917.28,3227.28 3910,3220 C1.1
NetC2_1: C2.1 R2.2 | length 36.8
  L1 w10: R2.2 C2.1
NetC11_2: C11.2 U1.5 U1.6 | length 67.3
  L1 w10: C11.2 3290.47,2804.53 U1.5 U1.6
NetC18_1: C18.1 U2.36 | length 150.4
  L1 w10: C18.1 3482.09,3192.91 3514.47,3192.91 3572.22,3250.66 3605.22,3250.66 U2.36
NetC19_1: C19.1 U2.29 | length 101.9
  L1 w10: C19.1@3571.58,3428.42 3592.62,3407.38 3642.62,3407.38 3651.22,3398.78 U2.29@3651.22,3388.82
NetC20_1: C20.1 U2.10 | length 151.9
  L1 w10: 3808.84,3091.16 U2.10 ; 3860.69,3039.31 3860.69,3036.24 3863.3,3033.63 3863.24,3033.57 C20.1
  L1 w15: 3808.84,3091.16 3860.69,3039.31
NetC21_1: C21.1 U2.38 | length 124.1
  L1 w10: C21.1 3549.94,3120.06 3549.94,3136.87 3576.22,3163.15 3576.22,3198.4 3589.11,3211.29 3605.22,3211.29 U2.38
NetC22_2: C22.2 U2.33 | length 77.9
  L1 w10: C22.2 3535.51,3322.05 3545.28,3312.28 3548.23,3312.28 3550.51,3310 U2.33
NetC23_1: C23.1 U2.3 | length 91.1
  L1 w10: C23.1 3670.75,3120.75 3670.75,3145.75 U2.3
NetC24_2: C24.2 U2.27 | length 126.2
  L1 w10: C24.2@3611.76,3463.24 3670.18,3404.82 3680.05,3404.82 3690.73,3394.14 U2.27
NetC26_2: C26.2 U1.3 | length 81.1
  L1 w10: C26.2 3280,2985.99 3285.86,2980.14 3297.01,2980.14 3309.93,2967.21 3309.93,2954.48 U1.3
NetC27_1: C27.1 U1.1 | length 60.3
  L1 w10: U1.1 3408.74,2954.25 C27.1
NetP1_1: P1.1 U2.16 | length 704.8
  L1 w10: U2.16 3835.29,3270.92 3865.92,3270.92 v1(3885,3290) ; P1.1 3995.43,2750 4005,2759.57 v1(4005,2785)
  L4 w10: v1(3885,3290) 3922.26,3290 4030,3182.26 4030,3094.1 4005,3069.1 v1(4005,2785)
NetP1_4: P1.4 U2.24 | length 1269.8
  L1 w10: v1@3699.82,3443.29 3745.81,3397.31 3745.81,3394.19 3749.78,3390.22 U2.24 ; P1.4 4147.62,2697.5 4212.5,2697.5 v1(4215,2695)
  L4 w10: v1(3700,3455) 3932.26,3455 4215,3172.26 v1(4215,2695)
NetP1_5: P1.5 U2.17 | length 993.3
  L1 w10: U2.17 3851.11,3290.32 3885.53,3324.73 v1(3885.53,3328.16) ; v1(3915,2650) P1.5
  L4 w10: v1(3885.53,3328.16) 3888.55,3328.16 3898.2,3337.81 3939.45,3337.81 4059.32,3217.94 4059.32,2794.32 v1(3915,2650)
NetP1_8: P1.8 U2.20 | length 1060
  L1 w10: U2.20 3868.87,3349.37 3881.28,3361.78 v1(3884.97,3361.78) ; P1.8 4145.53,2600.41 4214.58,2600.41 v1(4214.99,2600.82)
  L4 w10: v1(3884.97,3361.78) 3948.22,3361.78 4105,3205 4105,2710.8 v1(4214.99,2600.82)
NetP1_9: P1.9 U2.1 | length 927.2
  L1 w10: v1(3510,3015) 3513.63,3015 3631.67,3133.04 U2.1 ; v1(3915,2550) P1.9
  L4 w10: v1(3510,3015) 3510.45,3014.55 3510.45,2997.54 3755,2752.99 3825.07,2752.99 3875,2703.06 3875,2590 v1(3915,2550)
REF_CLK_N: C5.2 U2.9 | length 139.8
  L1 w7.6: U2.9 3789.15,3131.97 3785.61,3128.43 3785.61,3036.44 3800,3022.05 C5.2@3800,3013.62
REF_CLK_P: C4.2 U2.8 | length 143.1
  L1 w7.6: C4.2 3757.95,3013.62 3768.92,3024.58 3768.92,3027.18 3773.01,3031.27 3773.01,3128.43 3769.47,3131.97 U2.8
REF_SRC_N: C5.1 R4.2 Y2.4 | length 95.7
  L1 w7.6: Y2.4 3804.29,2916.73 R4.2 3810,2927.56 C5.1
REF_SRC_P: C4.1 R4.1 Y2.5 | length 92
  L1 w7.6: C4.1 3757.44,2963.94 R4.1 3760,2922.44 Y2.5
RFoutA_IC_N: C8.1 R5.1 U2.23 | length 221.9
  L1 w10: 3765,3405 U2.23
  L1 w15.58: C8.1 3678.45,3564.56 3689.79,3548.36 R5.1 3696.92,3524.32 3763.51,3407.84 cw(c3749.98,3400.11) 3763.81,3407.3 3765,3405
RFoutA_IC_P: C6.1 R1.2 U2.22 | length 222.2
  L1 w10: U2.22 3795,3405
  L1 w15.58: 3795,3405 3796.03,3406.97 cw(c3809.85,3399.78) 3796.32,3407.52 3863.08,3524.32 R1.2 3870.21,3548.36 3881.55,3564.56 C6.1
RFoutA_N: C8.2 J3.1 | length 252.3
  L1 w15.58: J3.1 3574.71,3747.79 3648.57,3630.35 C8.2
RFoutA_P: C6.2 J2.1 | length 251
  L1 w15.58: C6.2 3911.43,3630.35 3982.79,3747.79 J2.1
VCC: C7.1 C10.1 C12.2 C13.2 C14.2 C15.2 C16.1 C17.1 C25.1 C28.1 C29.1 C30.1 C31.1 R1.1 R5.2 U1.2 U2.7 U2.11 U2.15 U2.21 U2.26 U2.37 Y2.6 | length 1134.7
  L1 w10: C16.1 3516.7,3161.51 3586.16,3230.97 3605.22,3230.97 U2.37 ; C17.1@3644.62,3485.38 3656.01,3473.99 3656.01,3466.01 3660.31,3466.01 3662.61,3463.71 3662.61,3456.63 3710.41,3408.82 U2.26 ; C25.1 3712.83,2873.62 Y2.6 ; C14.2 3694.4,3060.6 3694.4,3074.4 3749.78,3129.78 U2.7 ; U2.21 3837.55,3375.53 3882.4,3420.38 C12.2@3896.21,3420.38 ; 3835,3137.98 U2.11 ; U2.15 3893.89,3250.94 3937.95,3295 C15.2@3945,3295
  L1 w15: U1.2 C10.1@3329.84,3009.33 ; 3835,3137.98 C13.2@3880.38,3092.6 ; v1(3930,3315) 3932.33,3315 3949.04,3298.3 C15.2
  L1 w16: C17.1 3644.62,3485.38 v1(3660,3470)
  L1 w30: C10.1 3330.24,3009.25 3350.75,3009.25 v1(3355,3005) ; C16.1 3518.46,3154.95 3518.79,3154.95 3520.55,3156.7 3531.7,3156.7 v1(3545,3170) ; C25.1 v1(3660,2900) ; C14.2 3696.75,3058.25 3697.09,3058.25 3713.84,3075 v1(3720,3075) ; R5.2 3752.25,3580 v1(3780,3580) 3807.75,3580 R1.1 ; v1(3855,3090) 3868.3,3076.7 3874.45,3076.7 3876.21,3074.95 3876.54,3074.95 C13.2 ; v1(3880,3400) C12.2
  other v1: 3350,3520 3380,3520 3295,3525 3325,3525 4050,3535 4050,3565 4055,3590 4055,3620
Vin: C9.1 J1.1 U1.7 U1.8 | length 458.8
  L1 w10: U1.7 U1.8 3349.53,2805.98 C9.1
  L1 w20: U1.8 3349.87,2845.75 3360.62,2835 3462.5,2835 3622.5,2675 J1.1
pads on no net: U2.5 U2.18 U2.19 U2.28 U2.30 U2.32 Y2.1 Y2.2

## Polygon pours and split planes (outlines as drawn)
GND on L1 "L1_GND" (solid, pour order 8): 3370,3180 3315,3125 3250,3125 3250,3060 3252.5,3057.5 3417.5,3057.5 3417.5,3132.5
GND on L1 "L1_GND" (solid, pour order 7): 3625,3530 3580,3575 3505,3575 3370,3440 3370,3105 3416.25,3058.75 3505,3050 3540,3085 3520,3090 3430,3180 3485,3235 3485,3410 3505,3410
GND on L1 "L1_GND" (solid, pour order 5): 3280,3585 3395,3585 3395,3645 3280,3645
VCC on L1 "L1_VCC" (solid, pour order 6): 3280,3565 3395,3565 3395,3505 3280,3505
GND on L1 "L1_GND" (solid, pour order 4): 4115,3630 4115,3525 4175,3525 4175,3630
VCC on L1 "L1_VCC" (solid, pour order 3): 4095,3630 4095,3525 4035,3525 4035,3630
VCC on L3 "L3_VCC" (solid, pour order 1): 3245,3940 4240,3940 4240,2520 3245,2520
GND on L2 "L2_GND" (solid, pour order 0): 3245,3940 3245,2520 4240,2520 4240,3940

## Silkscreen, mask and mechanical layers (free items; w line width, h text height)
Mechanical 1:
  lines w10: 3225,2500 3481.25,2500 3993.75,2500 4260,2500 4260,3955 3225,3955 3225,2500